# Altium PCB AudioMoth 1.1.0.PcbDoc
Units mm, origin at the board's own origin, x right, y up, seen from the top; angles counter-clockwise.
Board outline 58 x 48.36 mm, 2 copper layers (Top, Bottom); 86 components, 105 nets, 367 pads, 112 vias.
Unrouted connection lines stored in the file: 87.
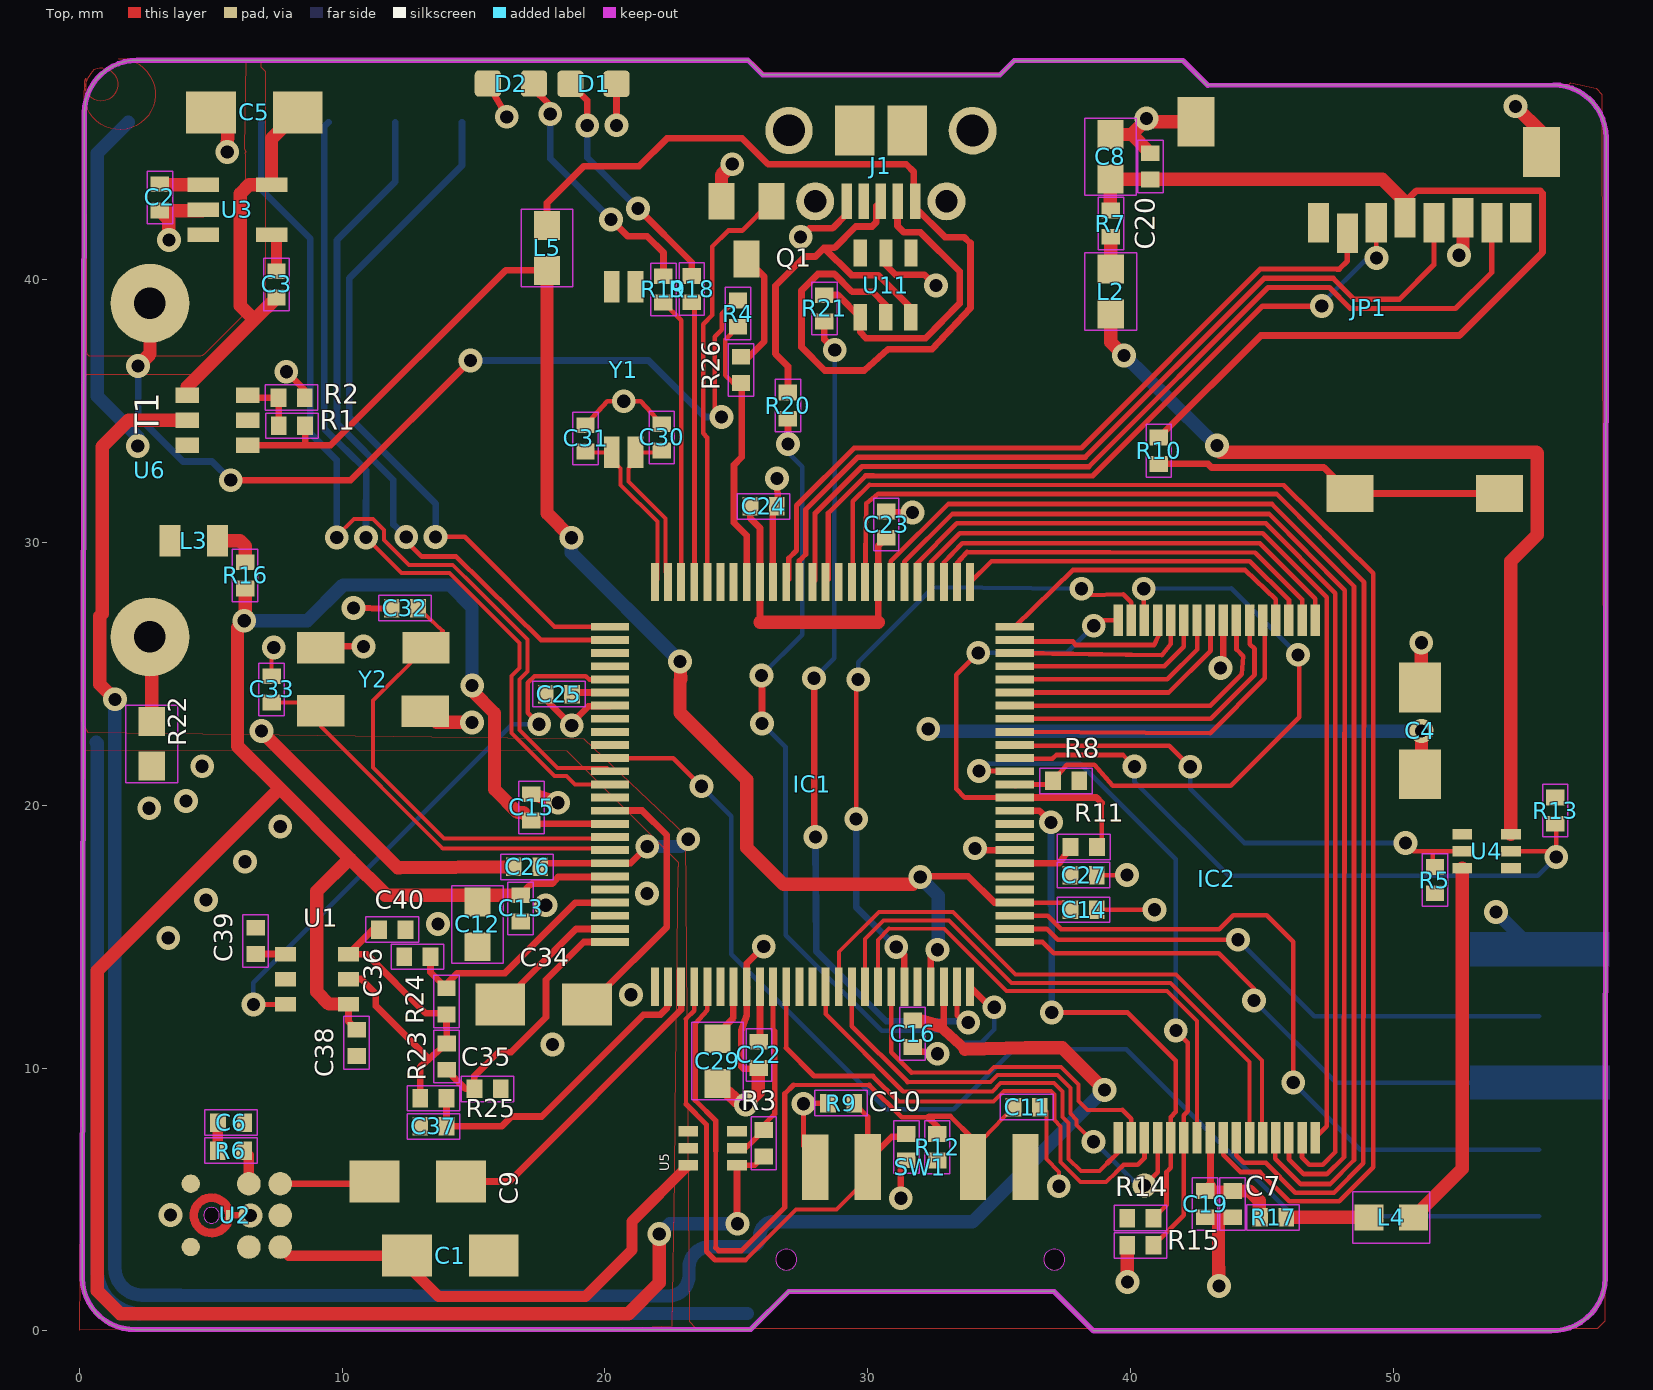
[diagram p0: Top view]
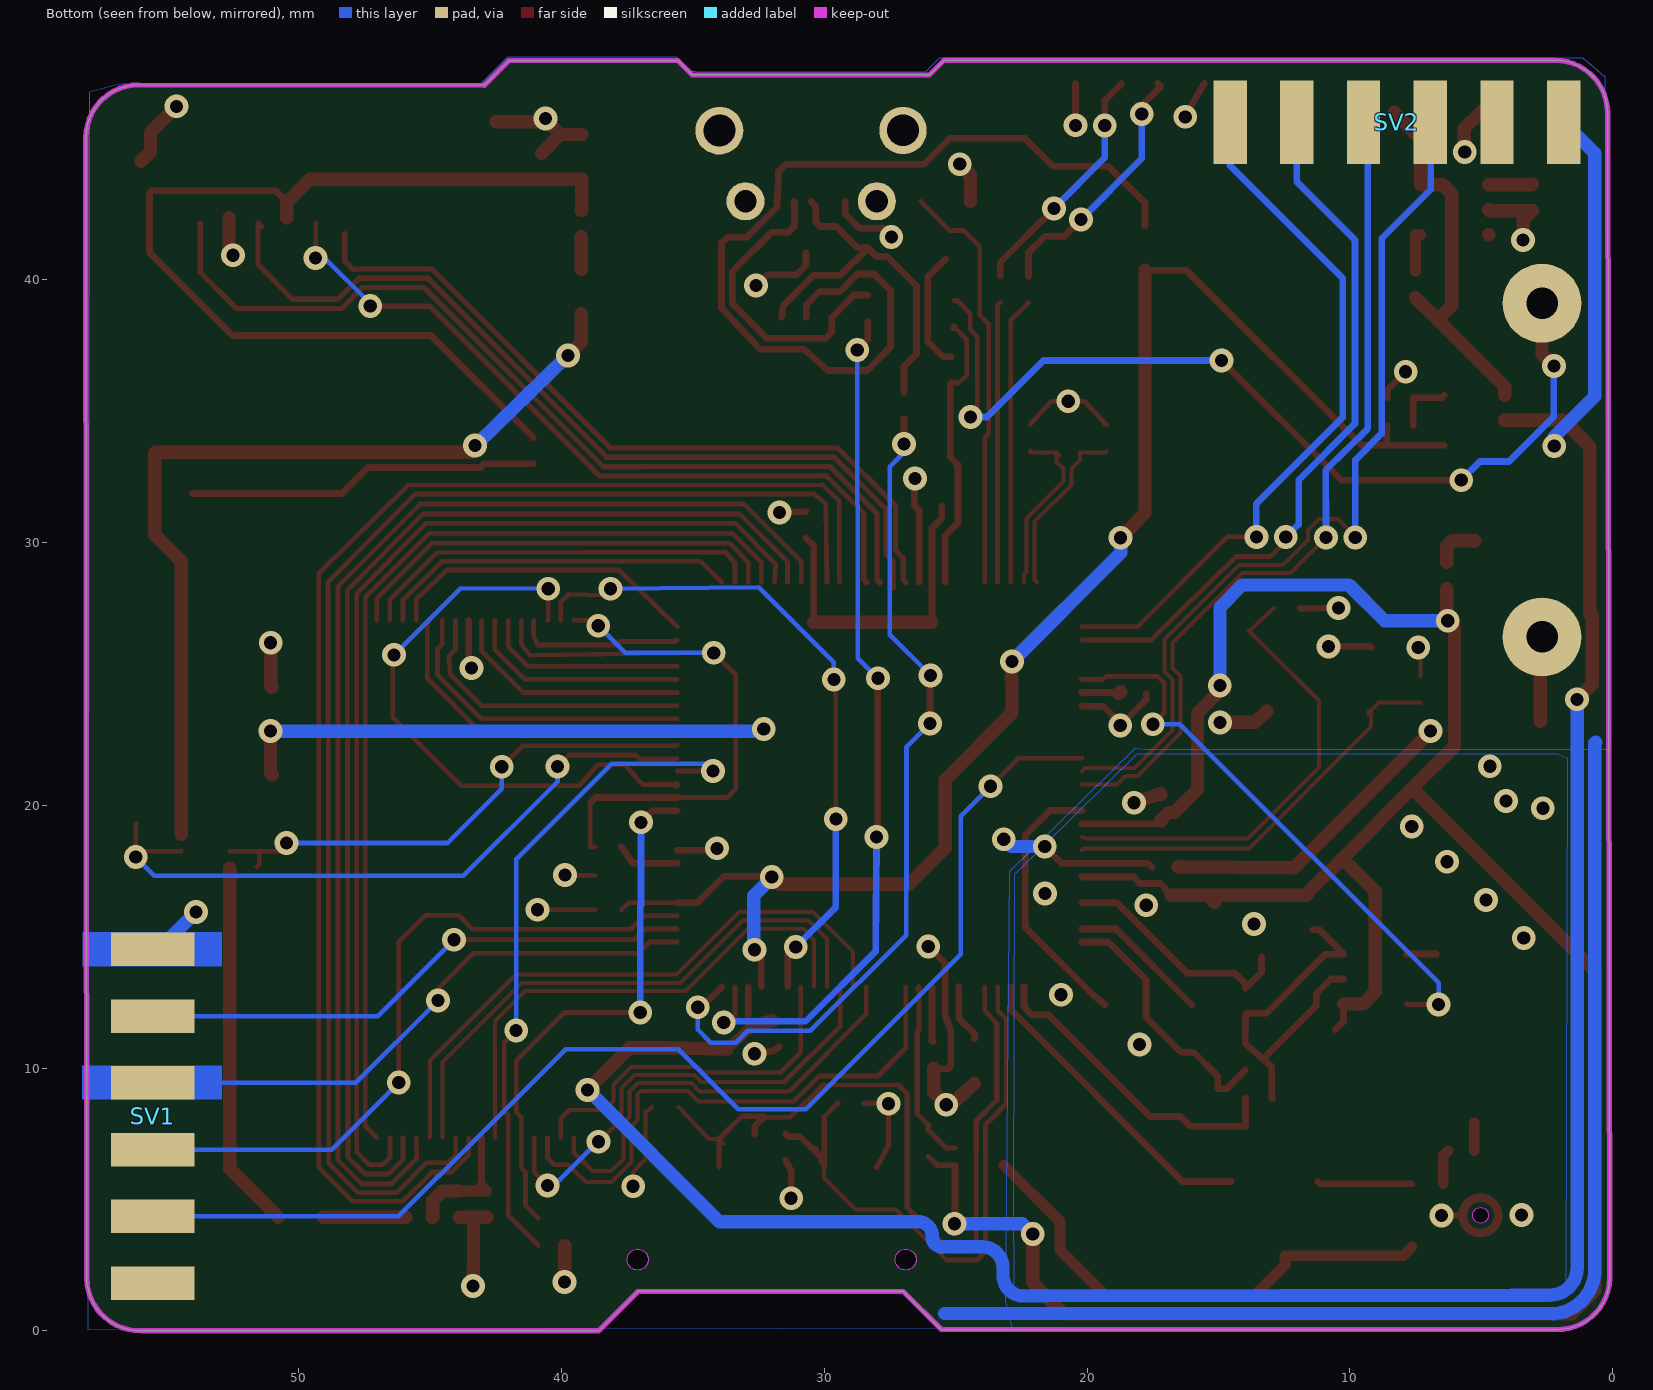
[diagram p1: Bottom view, seen from below]

## Layer stack, top to bottom
Top Solder: solder mask 0.0102, Solder Resist, Dk 3.5
Top: signal copper 0.035
Dielectric 1: dielectric 0.32, FR-4, Dk 4.8
Bottom: signal copper 0.035
Bottom Solder: solder mask 0.0102, Solder Resist, Dk 3.5

## Board outline
2.13,0.05 25.55,0.05 27,1.501 37.1,1.501 38.6,0 56,0 ccw(c56.04,2.04) 58.08,2 58.11,45.42 ccw(c56.11,45.42) 56.11,47.42 42.95,47.4 42,48.35 35.58,48.35 35.03,47.8 26.01,47.8 25.45,48.36 2.19,48.36 ccw(c2.19,46.36) 0.19,46.36 0.11,2 ccw(c2.095,2.035)
cut-out: 37.108,2.315 ccw(c37.108,2.715) 37.508,2.715 ccw(c37.108,2.715) 37.108,3.115 ccw(c37.108,2.715) 36.708,2.715 ccw(c37.108,2.715)
cut-out: 26.908,2.315 ccw(c26.908,2.715) 27.308,2.715 ccw(c26.908,2.715) 26.908,3.115 ccw(c26.908,2.715) 26.508,2.715 ccw(c26.908,2.715)
cut-out: 5.029,4.096 ccw(c5.029,4.396) 5.329,4.396 ccw(c5.029,4.396) 5.029,4.696 ccw(c5.029,4.396) 4.729,4.396 ccw(c5.029,4.396)

## Design rules (kind name [scope] priority, off if disabled: settings)
BoardOutlineClearance mdCopperDimension [All] p1: gap=0.254 ignorepadtopadclearanceinfootprint=FALSE except(0: Arc-SplitContinuation Track-SplitContinuation SMDPad-SplitContinuation THPad-SplitContinuation Via-SplitContinuation Fill-SplitContinuation Poly-SplitContinuation Region-SplitContinuation Text-SplitContinuation; 0.127: Poly-OutlineEdge Poly-CavityEdge Poly-CutoutEdge Poly-SplitBarrior)
Clearance "Clearance (Same Net)" [All] p1: gap=0.152 ignorepadtopadclearanceinfootprint=FALSE except(0.127: SMDPad-SMDPad SMDPad-THPad SMDPad-Via)
Clearance [All] p2: gap=0.152 ignorepadtopadclearanceinfootprint=FALSE except(0.127: Track-THPad Track-Via THPad-THPad THPad-Via Via-Via)
HoleSize [All] p1: absolutevalues=TRUE maxlimit=2540 minlimit=0.019 maxpercent=80.000 minpercent=20.000
HoleToHoleClearance mdDrill [All] p1: gap=0.076 allowstackedmicrovias=TRUE
MinimumSolderMaskSliver [All] p1 off: minsoldermaskwidth=0.254
PasteMaskExpansion Expansion_SMDPaste_OFF [InPadClass('SMDPaste_OFF')] p1: expansion=0
PasteMaskExpansion mlMinCreamFrame [All] p2: expansion=0
PolygonConnect PolygonConnect_For_PolygonThermal_ON_Width100000_Gap100000 [InPolygonClass('PolygonThermal_ON_Width100000_Gap100000') vs Not IsVia] p1: connectstyle=Relief reliefconductorwidth=0.254 reliefentries=4 polygonreliefangle="90 Angle" airgapwidth=0.254
PolygonConnect PolygonConnect_For_PolygonThermal_ON_Width70000_Gap100000 [InPolygonClass('PolygonThermal_ON_Width70000_Gap100000') vs Not IsVia] p2: connectstyle=Relief reliefconductorwidth=0.178 reliefentries=4 polygonreliefangle="90 Angle" airgapwidth=0.254
PolygonConnect ThermalVias [IsVia] p3: connectstyle=Direct reliefconductorwidth=0.254 reliefentries=4 polygonreliefangle="90 Angle" airgapwidth=0.254
PolygonConnect [All] p4: connectstyle=Relief reliefconductorwidth=0.254 reliefentries=4 polygonreliefangle="90 Angle" airgapwidth=0.254
RoutingVias [All] p1: holewidth=0.019 width=0.425 viastyle="Through Hole" minholewidth=0.019 minwidth=0.425 maxholewidth=2.54 maxwidth=2.54
SolderMaskExpansion Expansion_SMDSolder_OFF [InPadClass('SMDSolder_OFF')] p1: expansion=0 istentingtop=FALSE
SolderMaskExpansion mlMinStopFrame [All] p2: expansion=0 istentingtop=FALSE
Width [All] p1: maxlimit=0.254 minlimit=0.127 preferedwidth=0.127
26 further rules are at their usual default settings.

## Classes and differential pairs
polygon class PolygonThermal_ON_Width100000_Gap100000: Polygon_1_Net_AGND Polygon_1_Net_GND Polygon_2_Net_AGND
polygon class PolygonThermal_ON_Width70000_Gap100000: Polygon_1_Net_+3V3 Polygon_1_Net_VBAT
pad class SMDSolder_OFF: IC1-1 IC1-2 IC1-3 IC1-4 IC1-5 IC1-6 IC1-7 IC1-8 IC1-9 IC1-10 IC1-11 IC1-12 IC1-13 IC1-14 IC1-15 IC1-16 IC1-17 IC1-18 IC1-19 IC1-20 IC1-21 IC1-22 IC1-23 IC1-24 IC1-25 IC1-26 IC1-27 IC1-28 IC1-29 IC1-30 IC1-31 IC1-32 IC1-33 IC1-34 IC1-35 IC1-36 IC1-37 IC1-38 IC1-39 IC1-40 IC1-41 IC1-42 IC1-43 IC1-44 IC1-45 IC1-46 IC1-47 IC1-48 IC1-49 IC1-50 IC1-51 IC1-52 IC1-53 IC1-54 IC1-55 IC1-56 IC1-57 IC1-58 IC1-59 IC1-60 IC1-61 IC1-62 IC1-63 IC1-64 IC1-65 IC1-66 IC1-67 IC1-68 IC1-69 IC1-70 IC1-71 IC1-72 IC1-73 IC1-74 IC1-75 IC1-76 IC1-77 IC1-78 IC1-79 IC1-80 IC1-81 IC1-82 IC1-83 IC1-84 IC1-85 IC1-86 IC1-87 IC1-88 IC1-89 IC1-90 IC1-91 IC1-92 IC1-93 IC1-94 IC1-95 IC1-96 IC1-97 IC1-98 IC1-99 IC1-100
pad class SMDPaste_OFF: IC1-1 IC1-2 IC1-3 IC1-4 IC1-5 IC1-6 IC1-7 IC1-8 IC1-9 IC1-10 IC1-11 IC1-12 IC1-13 IC1-14 IC1-15 IC1-16 IC1-17 IC1-18 IC1-19 IC1-20 IC1-21 IC1-22 IC1-23 IC1-24 IC1-25 IC1-26 IC1-27 IC1-28 IC1-29 IC1-30 IC1-31 IC1-32 IC1-33 IC1-34 IC1-35 IC1-36 IC1-37 IC1-38 IC1-39 IC1-40 IC1-41 IC1-42 IC1-43 IC1-44 IC1-45 IC1-46 IC1-47 IC1-48 IC1-49 IC1-50 IC1-51 IC1-52 IC1-53 IC1-54 IC1-55 IC1-56 IC1-57 IC1-58 IC1-59 IC1-60 IC1-61 IC1-62 IC1-63 IC1-64 IC1-65 IC1-66 IC1-67 IC1-68 IC1-69 IC1-70 IC1-71 IC1-72 IC1-73 IC1-74 IC1-75 IC1-76 IC1-77 IC1-78 IC1-79 IC1-80 IC1-81 IC1-82 IC1-83 IC1-84 IC1-85 IC1-86 IC1-87 IC1-88 IC1-89 IC1-90 IC1-91 IC1-92 IC1-93 IC1-94 IC1-95 IC1-96 IC1-97 IC1-98 IC1-99 IC1-100 U4-1 U4-2 U4-3 U4-4 U4-5 U4-6 U5-1 U5-2 U5-3 U5-4 U5-5 U5-6

## Components (designator, comment, footprint, x,y, rotation, side; value= is the part's Value field where it differs from the comment)
C1 "" EIA3216-KIT 14.121,2.864 r180 top
C2 "" 0402 3.062,43.139 r270 top
C3 "" 0402 7.503,39.828 r90 top
C4 "" EIA3216-KIT 51.031,22.836 r270 top
C5 "" EIA3216-KIT 6.662,46.38 r0 top
C6 "" 0402 5.772,7.925 r0 top
C7 "" 0402 43.891,4.826 r270 top
C8 "" C0603 39.242,44.686 r90 top
C9 "" EIA3216-KIT 12.875,5.682 r180 top
C10 "" 0402 31.474,6.994 r90 top
C11 "" 0402 36.057,8.514 r180 top
C12 "" 0603-CAP 15.151,15.469 r270 top
C13 "" 0402 16.794,16.083 r270 top
C14 "" 0402 38.226,16.027 r0 top
C15 "" 0402 17.205,19.928 r90 top
C16 "" 0402 31.715,11.309 r270 top
C19 "" 0402 42.849,4.82 r270 top
C20 "" 0402 40.762,44.321 r90 top
C22 "" 0402 25.863,10.507 r270 top
C23 "" 0402 30.711,30.687 r90 top
C24 "" 0402 26.04,31.378 r0 top
C25 "" 0402 18.251,24.238 r180 top
C26 "" 0402 17.037,17.658 r180 top
C27 "" 0402 38.225,17.344 r0 top
C29 "" C0603 24.286,10.268 r270 top
C30 "" 0402 22.166,34.004 r270 top
C31 "" 0402 19.264,33.972 r270 top
C32 "" 0402 12.392,27.509 r0 top
C33 "" 0402 7.318,24.417 r270 top
C34 "" EIA3216-KIT 17.67,12.415 r0 top
C35 "" 0402 15.536,9.212 r0 top
C36 "" 0402 12.864,14.24 r180 top
C37 "" 0402 13.47,7.785 r180 top
C38 "" 0402 10.553,10.965 r270 top
C39 "" 0402 6.71,14.845 r90 top
C40 "" 0402 11.909,15.27 r0 top
D1 "" LED-0603 19.569,47.466 r270 top
D2 "" LED-0603 16.425,47.473 r90 top
IC1 "" QFP100 27.903,20.798 r270 top
IC2 "" IS62WV256 43.288,17.202 r0 top
J1 "" USB-MICRO-MOLEX-105017-0001 33.006,42.99 r180 top
JP1 "" 693071010811 47.16,42.171 r0 top
L2 "" 0603-RES 39.257,39.559 r90 top
L3 "" 0805 4.353,30.067 r0 top
L4 "" 0603-RES 49.932,4.319 r180 top
L5 "" 0603-RES 17.801,41.215 r270 top
Q1 "" SOT23 25.39,41.893 r180 top
R1 "" 0402 8.09,34.45 r0 top
R2 "" 0402 8.08,35.521 r180 top
R3 "" 0402 26.049,7.141 r90 top
R4 "" 0402 25.069,38.719 r90 top
R5 "" 0402 51.596,17.16 r90 top
R6 "" 0402 5.769,6.861 r0 top
R7 "" 0402 39.261,42.143 r90 top
R8 "" 0402 37.559,20.935 r0 top
R9 "" 0402 28.993,8.667 r180 top
R10 "" 0402 41.081,33.498 r90 top
R11 "" 0402 38.227,18.415 r180 top
R12 "" 0402 32.651,6.988 r90 top
R13 "" 0402 56.173,19.799 r270 top
R14 "" 0402 40.386,4.293 r180 top
R15 "" 0402 40.386,3.252 r0 top
R16 "" 0402 6.308,28.755 r90 top
R17 "" 0402 45.438,4.319 r180 top
R18 "" 0402 23.309,39.653 r270 top
R19 "" 0402 22.229,39.64 r270 top
R20 "" 0402 26.968,35.218 r90 top
R21 "" 0402 28.356,38.92 r90 top
R22 "" 0603-RES 2.756,22.342 r270 top
R23 "" 0402 13.98,10.435 r90 top
R24 "" 0402 13.973,12.54 r270 top
R25 "" 0402 13.47,8.855 r180 top
R26 "" 0402 25.182,36.576 r270 top
SV1 "" TSM-106-X-SH-BOARDEDGE 54.083,8.169 r270 bottom
SV2 "" TSM-106-X-SH-BOARDEDGE 8.21,44.53 r0 bottom
SW1 "" CT10-XXXX-G4 28.008,5.215 r0 top
T1 "" SOT23-6 5.26,34.66 r90 top
U1 "" SOT26@1 9.042,13.389 r270 top
U2 "" SPM0408LE5H-TB 5.945,4.4 r270 top
U3 "" SOT23-5 6.014,42.676 r270 top
U4 "" SC-70 53.56,18.258 r270 top
U5 "" SC-70 24.105,6.957 r90 top
U6 "" BATTERY-AAX3 29.107,24.191 r0 top
U11 "" SC-74 30.924,39.775 r180 top
Y1 "" CRYSTAL-32KHZ-SMD_EPSON_MC146 21.465,32.839 r90 top
Y2 "" XRCGB48M000F4M00R0 11.227,24.694 r180 top

## Footprints (in the part's own frame and the unit in brackets; to place one, negate y for a bottom-side part, rotate by r counter-clockwise, add the part's x,y. Pads: shape width x height; smd on the part's side, far side on the other; paste and mask are expansions set on the pad)
0402 [mm] "0402"
  rect 0.6x0.7 smd: 1(-0.5,0) 2(0.5,0)
  Top keep-out lines w0.051: 1,-0.483 -1,-0.483 -1,0.483 1,0.483 1,-0.483
  body extent -1.03,-0.51 1.03,0.51, height 3.81
0603-CAP [mm] "0603-CAP"
  rect 1.1x1 smd: 1(-0.85,0) 2(0.85,0)
  Top keep-out lines w0.051: 1.473,-0.983 -1.473,-0.983 -1.473,0.983 1.473,0.983 1.473,-0.983
  body extent -1.5,-1.01 1.5,1.01, height 3.81
0603-RES [mm] "0603-RES"
  rect 1.1x1 smd: 1(-0.85,0) 2(0.85,0)
  Top keep-out lines w0.051: -1.473,0.983 -1.473,-0.983 1.473,-0.983 1.473,0.983 -1.473,0.983
  body extent -1.5,-1.01 1.5,1.01, height 3.81
0805 [mil] "0805"
  rect 31.5x47.24 smd: 1(-35.43,0) 2(35.43,0)
  body extent -51,-24 51,24, height 50
693071010811 [mil] "693071010811"
  rect 31.5x59.06 smd: 1(0,0) 2(43.31,-15.75) 3(86.61,0) 4(129.92,7.87) 5(173.23,0) 6(216.54,7.87) 7(259.84,0) 8(303.15,0)
  rect 55.12x74.8 smd: Z1(-183.46,151.57) Z2(334.25,106.3)
  rect 70.87x55.12 smd: Z3(47.24,-405.51) Z4(271.26,-405.51)
  body extent -211,-433 362,359, height 150
BATTERY-AAX3 [mm] "BATTERY-AAX3"
  round 3 hole 1.2: GND@2(-26.42,2.22) PWR@1(-26.42,14.92)
  body extent -27.93,0.71 -24.91,16.43, height 1.27
C0603 [mm] "C0603"
  rect 1.1x1 smd: 1(-0.85,0) 2(0.85,0)
  Top keep-out lines w0.051: -1.473,0.983 -1.473,-0.983 1.473,-0.983 1.473,0.983 -1.473,0.983
  body extent -1.5,-1.01 1.5,1.01, height 3.81
CRYSTAL-32KHZ-SMD_EPSON_MC146 [mm] "CRYSTAL-32KHZ-SMD_EPSON_MC146"
  rect 1.2x0.6 smd: NC1(6.9,1.2) NC2(6.9,0.3) P$1(0.6,0.3) P$2(0.6,1.2)
  body extent 0,-0.07 7.5,1.57, height 3.81
CT10-XXXX-G4 [mm] "CT10-XXXX-G4"
  rect 1x2.5 smd: 1(0,1.01) 2(2,1.025) 3(6,1.025) 4(8,1.025)
  body extent -0.5,-0.24 8.5,2.27, height 1.27
EIA3216-KIT [mm] "EIA3216-KIT"
  rect 1.9x1.6 smd: A(1.65,0) C(-1.65,0)
  body extent -2.6,-0.8 2.6,0.8, height 1.27
IS62WV256 [mm] "IS62WV256"
  rect 0.36x1.2 smd: 1(-3.75,-9.85) 2(-3.25,-9.85) 3(-2.75,-9.85) 4(-2.25,-9.85) 5(-1.75,-9.85) 6(-1.25,-9.85) 7(-0.75,-9.85) 8(-0.25,-9.85) 9(0.25,-9.85) 10(0.75,-9.85) 11(1.25,-9.85) 12(1.75,-9.85) 13(2.25,-9.85) 14(2.75,-9.85) 15(3.25,-9.85) 16(3.75,-9.85) 17(3.75,9.85) 18(3.25,9.85) 19(2.75,9.85) 20(2.25,9.85) 21(1.75,9.85) 22(1.25,9.85) 23(0.75,9.85) 24(0.25,9.85) 25(-0.25,9.85) 26(-0.75,9.85) 27(-1.25,9.85) 28(-1.75,9.85) 29(-2.25,9.85) 30(-2.75,9.85) 31(-3.25,9.85) 32(-3.75,9.85)
  body extent -3.93,-10.45 3.93,10.45, height 3.81
LED-0603 [mm] "LED-0603"
  rrect30% 1x1 smd: A(0,-0.877) C(0,0.877)
  body extent -0.51,-1.39 0.51,1.39, height 1.27
QFP100 [mm] "QFP100"
  rect 1.45x0.3 smd paste+0 mask+0: 1(-7.7,6) 2(-7.7,5.5) 3(-7.7,5) 4(-7.7,4.5) 5(-7.7,4) 6(-7.7,3.5) 7(-7.7,3) 8(-7.7,2.5) 9(-7.7,2) 10(-7.7,1.5) 11(-7.7,1) 12(-7.7,0.5) 13(-7.7,0) 14(-7.7,-0.5) 15(-7.7,-1) 16(-7.7,-1.5) 17(-7.7,-2) 18(-7.7,-2.5) 19(-7.7,-3) 20(-7.7,-3.5) 21(-7.7,-4) 22(-7.7,-4.5) 23(-7.7,-5) 24(-7.7,-5.5) 25(-7.7,-6) 51(7.7,-6) 52(7.7,-5.5) 53(7.7,-5) 54(7.7,-4.5) 55(7.7,-4) 56(7.7,-3.5) 57(7.7,-3) 58(7.7,-2.5) 59(7.7,-2) 60(7.7,-1.5) 61(7.7,-1) 62(7.7,-0.5) 63(7.7,0) 64(7.7,0.5) 65(7.7,1) 66(7.7,1.5) 67(7.7,2) 68(7.7,2.5) 69(7.7,3) 70(7.7,3.5) 71(7.7,4) 72(7.7,4.5) 73(7.7,5) 74(7.7,5.5) 75(7.7,6)
  rect 0.3x1.45 smd paste+0 mask+0: 26(-6,-7.7) 27(-5.5,-7.7) 28(-5,-7.7) 29(-4.5,-7.7) 30(-4,-7.7) 31(-3.5,-7.7) 32(-3,-7.7) 33(-2.5,-7.7) 34(-2,-7.7) 35(-1.5,-7.7) 36(-1,-7.7) 37(-0.5,-7.7) 38(0,-7.7) 39(0.5,-7.7) 40(1,-7.7) 41(1.5,-7.7) 42(2,-7.7) 43(2.5,-7.7) 44(3,-7.7) 45(3.5,-7.7) 46(4,-7.7) 47(4.5,-7.7) 48(5,-7.7) 49(5.5,-7.7) 50(6,-7.7) 76(6,7.7) 77(5.5,7.7) 78(5,7.7) 79(4.5,7.7) 80(4,7.7) 81(3.5,7.7) 82(3,7.7) 83(2.5,7.7) 84(2,7.7) 85(1.5,7.7) 86(1,7.7) 87(0.5,7.7) 88(0,7.7) 89(-0.5,7.7) 90(-1,7.7) 91(-1.5,7.7) 92(-2,7.7) 93(-2.5,7.7) 94(-3,7.7) 95(-3.5,7.7) 96(-4,7.7) 97(-4.5,7.7) 98(-5,7.7) 99(-5.5,7.7) 100(-6,7.7)
  body extent -8.49,-8.49 8.49,8.49, height 3.81
SC-70 [mm] "SC-70"
  rect 0.4x0.75 smd paste+0: 1(-0.65,-0.925) 2(0,-0.925) 3(0.65,-0.925) 4(0.65,0.925) 5(0,0.925) 6(-0.65,0.925)
  body extent -1.07,-1.3 1.07,1.3, height 3.81
SC-74 [mil] "SC-74"
  rect 20x40 smd: 1(-28.62,-49.13) 2(8.86,-49.21) 3(47.24,-49.21) 4(47.44,47.24) 5(9.25,47.05) 6(-28.54,47.24)
  body extent -39,-69 57,67, height 50
SOT23 [mm] "SOT23"
  rect 1x1.4 smd: 1(-0.95,-1.1) 2(0.95,-1.1) 3(0,1.1)
  body extent -1.5,-1.8 1.5,1.8, height 3.81
SOT23-5 [mm] "SOT23-5"
  rect 0.55x1.2 smd: 1(-0.95,-1.3) 2(0,-1.3) 3(0.95,-1.3) 4(0.95,1.3) 5(-0.95,1.3)
  body extent -1.48,-1.9 1.48,1.9, height 3.81
SOT23-6 [mm] "SOT23-6"
  rect 0.6x0.9 smd: 1(-0.95,-1.15) 2(0,-1.15) 3(0.95,-1.15) 4(0.95,1.15) 5(0,1.15) 6(-0.95,1.15)
  body extent -1.51,-1.6 1.5,1.6, height 3.81
SOT26@1 [mil] "SOT26@1"
  rect 21.65x31.5 smd: 1(-37.4,-47.24) 2(0,-47.24) 3(37.4,-47.24) 4(37.4,47.24) 5(0,47.24) 6(-37.4,47.24)
  body extent -62,-63 62,63, height 150
SPM0408LE5H-TB [mil] "SPM0408LE5H-TB"
  rrect100% 35.43x35.43 smd: P$1(-47.24,66.93) P$2(-47.24,19.92) P$5(47.56,19.92) P$6(47.56,66.93) P$7(0.16,66.93)
  rrect100% 27.56x27.56 smd: P$3(-47.24,-67.17) P$4(47.56,-67.17)
  rrect3% 16x8 smd: P$8(0,-10.24)
  Top circle w12.99: c0.16,-36.06 r26.5
  body extent -65,-81 66,85, height 150
TSM-106-X-SH-BOARDEDGE [mil] "TSM-106-X-SH-BOARDEDGE"
  rect 50x125 smd: 1(-250,-58) 2(-150,-58) 3(-50,-58) 4(50,-58) 5(150,-58) 6(250,-58)
  body extent -275,-121 275,5, height 50
USB-MICRO-MOLEX-105017-0001 [mm] "USB-MICRO-MOLEX-105017-0001"
  rect 0.4x1.35 smd: 1(1.2,0) 2(1.85,0) 3(2.5,0) 4(3.15,0) 5(3.8,0)
  round 1.45 hole 0.85: P$1(0,0) P$2(5,0)
  rect 1.5x1.9 smd: P$3(3.5,-2.7) P$4(1.5,-2.7)
  round 1.8 hole 1.2: P$5(-1.006,-2.685) P$6(5.997,-2.697) P$7(-0.983,-2.697)
  body extent -1.91,-3.65 6.9,0.73, height 1.27
XRCGB48M000F4M00R0 [mil] "XRCGB48M000F4M00R0"
  rect 70.87x47.24 smd: P$1(-77.28,-51.42) P$2(80.12,-51.5) P$3(80.24,43.03) P$4(-76.48,43.58)
  body extent -113,-75 116,67, height 50

## Part data
C1 C4 C5 C9 C34: library part EIA3216-KIT, PackageName=EIA3216-KIT
C2 C3 C6 C7 C10 C11 C13 C14 C15 C16 C19 C20 C22 C23 C24 C25 C26 C27 C30 C31 C32 C33 C35 C36 C37 C38 C39 C40 R1 R2 R3 R4 R5 R6 R7 R8 R9 R10 R11 R12 R13 R14 R15 R16 R17 R18 R19 R20 R21 R23 R24 R25 R26: library part 0402, PackageName=0402
C8 C29: library part C0603, PackageName=C0603
C12: library part 0603-CAP, PackageName=0603-CAP
D1 D2: library part LED-0603, PackageName=LED-0603
IC1: library part QFP100, PackageName=QFP100
IC2: library part IS62WV256, PackageName=IS62WV256
J1: library part USB-MICRO-MOLEX-105017-0001, PackageName=USB-MICRO-MOLEX-105017-0001
JP1: library part 693071010811, PackageName=693071010811
L2 L4 L5 R22: library part 0603-RES, PackageName=0603-RES
L3: library part 0805, PackageName=0805
Q1: library part SOT23, PackageName=SOT23
SV1 SV2: library part TSM-106-X-SH-BOARDEDGE, PackageName=TSM-106-X-SH-BOARDEDGE
SW1: library part CT10-XXXX-G4, PackageName=CT10-XXXX-G4
T1: library part SOT23-6, PackageName=SOT23-6
U1: library part SOT26@1, PackageName=SOT26@1
U2: library part SPM0408LE5H-TB, PackageName=SPM0408LE5H-TB
U3: library part SOT23-5, PackageName=SOT23-5
U4 U5: library part SC-70, PackageName=SC-70
U6: library part BATTERY-AAX3, PackageName=BATTERY-AAX3
U11: library part SC-74, PackageName=SC-74
Y1: library part CRYSTAL-32KHZ-SMD_EPSON_MC146, PackageName=CRYSTAL-32KHZ-SMD_EPSON_MC146
Y2: library part XRCGB48M000F4M00R0, PackageName=XRCGB48M000F4M00R0

## Free pads (board coordinates)
  round 0.6 hole 0.6 unplated: MH1(5.029,4.396)
  round 0.8 hole 0.8 unplated: MH1(26.908,2.715) MH2(37.108,2.715)

## Via types
v1: diameter 0.907/0.907 (per signal layer), hole 0.5, Top to Bottom, 112 vias

## Nets (pads, with @x,y where several pads share a name; then routed paths per layer and width w, separated by ;. In a path a pad name is that pad's centre, name@x,y a point inside that pad or via, vN(x,y) a via of type N, cw(c..) or ccw(c..) an arc to the next point about the centre after c; other vN are vias at no path point)
+3V3: C4.A C23.1 C24.1 C25.1 C26.1 C27.1 C29.1 IC1.8 IC1.17 IC1.31 IC1.44 IC1.57 IC1.82 L3.1 R5.1 R8.2 R11.2 R12.1 R13.1 R14.2 SV1.1 SV2.1 T1.2 T1.6 U4.1 U4.4 | length 62.3
  Top w0.254: C26.1 17.676,17.798 IC1.44 20.98,17.798 v1(21.616,18.434) ; C25.1 18.811,24.298 IC1.31 18.836,24.298 C25.1@18.796,24.257 ; C29.1 24.279,11.3 24.892,11.913 24.892,13.087 IC1.57 ; C24.1 25.54,30.924 25.908,30.557 25.908,28.503 IC1.17 25.903,26.981 25.908,26.975 ; 30.404,26.975 30.404,28.496 IC1.8 30.403,29.879 C23.1 ; IC1.82 37.287,17.798 R11.2
  Top w0.508: C25.1@18.72,24.334 C25.1@18.796,24.257 ; 25.908,26.975 30.404,26.975 ; C4.A@51.01,21.165 C4.A 51.08,21.235 v1(51.08,22.828)
  Bottom w0.5: 0.678,40.3 0.678,44.822 SV2.1
  Bottom w0.508: 0.678,40.3 0.678,35.571 2.22,34.029 v1(2.22,33.677) ; v1(21.616,18.434) 22.897,18.434 v1(23.175,18.712) ; v1(32.309,22.911) 32.392,22.828 v1(51.08,22.828) ; v1(53.923,15.938) 55.343,14.519 SV1.1
AGND: C1.C C6.2 C12.2 C13.2 C15.2 C35.2 C36.2 C37.2 C38.2 C39.2 C40.2 IC1.48 IC1.51 R22.2 U1.2 U2.P$3 U2.P$4 U2.P$5 U2.P$7 U2.P$8 | length 2
  Top w0.254: U2.P$8 5.689,4.397 v1(6.509,4.397)
  Top w0.508: v1@4.631,21.446 v1(4.674,21.489) ; C15.2 17.221,20.444 v1(18.211,20.099)
  other v1: 3.474,4.404 18.008,10.897 21,12.794 3.384,14.957 13.65,15.489 17.749,16.202 4.824,16.395 21.599,16.652 6.3,17.853 7.644,19.196 2.657,19.889 4.057,20.169
BAT_ACMP_V: IC1.18 R4.1 R26.2 | length 10.7
  Top w0.178: R4.1 24.58,37.73 24.58,36.376 24.879,36.077 R26.2
  Top w0.254: R4.1@25.069,38.183 R4.1 ; R26.2 25.207,36.051 25.207,33.249 24.917,32.96 24.917,30.76 25.403,30.275 IC1.18
BAT_MON_EN: IC1.21 Q1.1 | length 15.9
  Top w0.178: IC1.21 23.903,34 23.741,34.161 23.741,38.316 24.089,38.664 24.089,41.273 24.696,41.88 25.227,41.88 Q1.1
CPU_FET_SD_EN_N: IC1.91 R5.2 U4.2 | length 19.8
  Top w0.178: IC1.91 35.624,22.276 41.478,22.276 v1(42.283,21.468) ; v1(50.47,18.568) 50.78,18.258 51.511,18.258 ; R5.2 51.511,17.744 51.511,18.258 ; U4.2 51.511,18.258
  Bottom w0.178: v1(42.283,21.468) 42.283,20.633 44.348,18.568 v1(50.47,18.568)
CPU_FET_SRAM_EN_N: IC1.90 R13.2 U4.5 | length 26.3
  Top w0.178: IC1.90 35.625,21.776 37.036,21.776 37.178,21.918 39.721,21.918 v1(40.16,21.479) ; U4.5 55.987,18.258 v1(56.21,18.034) 56.21,19.262 R13.2
  Bottom w0.178: v1(40.16,21.479) 40.16,20.902 43.739,17.323 55.499,17.323 v1(56.21,18.034)
CPU_SD_CLK: IC1.14 JP1.5 | length 33.3
  Top w0.2: IC1.14 27.403,29.313 27.648,29.558 27.648,31.262 29.64,33.254 38.285,33.254 45.091,40.06 47.722,40.06 48.519,39.263 50.242,39.263 51.56,40.58 JP1.5 JP1.5@51.42,42.031
  Top w0.254: IC1.14@27.403,28.278 IC1.14
CPU_SD_CS: IC1.15 JP1.2 | length 28.9
  Top w0.2: IC1.15 27,28.595 27,29.409 27.295,29.704 27.295,31.407 29.494,33.606 38.139,33.606 44.946,40.413 47.868,40.413 47.87,40.41 47.95,40.41 48.26,40.721 JP1.2
CPU_SD_MOSI: IC1.12 JP1.3 | length 29
  Top w0.178: JP1.3 49.366,42.165 v1(49.366,40.831)
  Top w0.2: IC1.12 28.5,28.595 28.5,31.117 29.932,32.549 30.215,32.549 37.171,32.538 38.566,32.538 45.03,39.002 v1(47.283,39.002)
  Top w0.254: IC1.12 IC1.12@28.403,28.488
  Bottom w0.178: v1(47.283,39.002) 47.258,39.078 49.011,40.831 v1(49.366,40.831)
CPU_SRAM_CS0: IC1.88 IC2.30 R8.1 | length 23.3
  Top w0.178: IC1.88@35.623,20.778 IC1.88 36.919,20.798 R8.1 37.59,21.552 38.628,21.552 39.329,20.752 43.828,20.752 46.431,23.355 46.431,25.68 v1(46.38,25.731) ; IC1.88@35.648,20.803 IC1.88@35.699,20.752 ; v1(40.513,28.245) 40.513,27.076 IC2.30
  Top w0.254: IC1.88@35.623,20.778 IC1.88@35.648,20.803
  Bottom w0.178: v1(40.513,28.245) 43.84,28.271 v1(46.38,25.731)
CPU_SRAM_CS1: IC1.89 IC2.6 R15.2 | length 25.9
  Top w0.178: v1(34.239,21.311) 35.589,21.311 IC1.89 ; R15.2 42.037,4.403 IC2.6 ; v1(41.732,11.43) 42.189,10.973 42.189,8.357 42.038,8.205 IC2.6
  Bottom w0.178: v1(34.239,21.311) 34.519,21.59 38.1,21.59 41.732,17.958 v1(41.732,11.43)
CPU_SRAM_OE_N: IC1.87 IC2.32 R11.1 | length 19
  Top w0.178: v1(34.214,25.807) 33.376,24.969 33.376,20.625 33.703,20.298 IC1.87 ; v1(38.608,26.838) 38.824,27.052 IC2.32 ; R11.1 38.913,18.424 38.913,20.092
  Top w0.254: IC1.87 38.707,20.298 38.913,20.092
  Bottom w0.178: v1(34.214,25.807) 37.579,25.807 v1(38.608,26.838)
CPU_SRAM_WE_N: IC1.86 IC2.5 R14.1 | length 20.7
  Top w0.178: v1(37.008,12.116) 39.903,12.116 41.732,10.287 41.732,8.332 41.538,8.137 IC2.5 ; R14.1 41.377,4.784 41.377,6.046 41.538,6.207 IC2.5 ; IC2.5@41.529,7.343 IC2.5
  Top w0.254: IC1.86 36.54,19.798 v1(36.982,19.355)
  Bottom w0.254: v1(36.982,19.355) 36.982,16.206 37.008,16.18 v1(37.008,12.116)
CPU_USB_D+: IC1.75 R20.1 | length 33
  Top w0.254: v1(25.959,24.943) 25.984,24.918 v1(25.984,23.114) ; R20.1 26.968,33.763 v1(26.975,33.757) ; IC1.75 34.823,12.177 v1(34.823,12.319)
  Bottom w0.178: v1(25.959,24.943) 27.508,26.493 27.508,32.893 26.975,33.427 v1@26.975,33.579 ; v1(25.984,23.114) 26.873,22.225 26.873,16.815 26.886,16.802 26.886,15.065 30.533,11.418 32.918,11.418 33.371,10.966 34.318,10.966 34.823,11.471 v1(34.823,12.319)
  Bottom w0.254: v1@26.975,33.579 v1(26.975,33.757)
CPU_USB_D-: IC1.74 R21.1 | length 33
  Top w0.178: IC1.74 33.403,11.991 v1(33.833,11.735)
  Top w0.254: v1(27.965,24.842) 27.965,19.025 28.016,18.974 v1(28.016,18.796) ; R21.1 28.356,37.735 v1(28.753,37.338)
  Bottom w0.178: v1(27.965,24.842) 28.727,25.604 v1(28.753,37.338)
  Bottom w0.254: v1(28.016,18.796) 28.042,14.453 30.709,11.786 33.63,11.786 v1(33.833,11.735)
GND: C2.2 C4.C C5.C C7.2 C8.2 C10.1 C11.1 C14.2 C16.2 C19.2 C20.2 C22.2 C23.2 C24.2 C25.2 C26.2 C27.2 C29.2 C30.1 C31.1 C32.1 C33.1 D1.C D2.C IC1.16 IC1.32 IC1.58 IC1.83 IC2.24 J1.5 JP1.6 JP1.Z1 JP1.Z2 Q1.2 R2.1 R9.2 R15.1 R22.1 SV1.6 SV2.2 SW1.1 U3.2 U6.GND@2 U11.2 Y2.P$2 Y2.P$4 | length 137.1
  Top w0.152: C33.1 7.318,25.96 v1(7.396,26.011) ; C11.1 36.807,8.344 36.807,6.533 37.289,6.05 v1(37.279,5.503)
  Top w0.178: C31.1 20.094,35.382 v1(20.718,35.382) 21.368,35.382 C30.1 ; C27.2 39.868,17.344 v1(39.874,17.35) ; C14.2 40.003,16.027 v1(40.915,16.029)
  Top w0.2: SW1.1 27.565,7.038 v1(27.565,8.645) 27.587,8.667 R9.2
  Top w0.254: v1(7.877,36.507) 8.58,35.804 R2.1 ; Y2.P$2 9.241,26.052 v1(10.817,26.052) ; v1(10.437,27.518) 11.75,27.484 C32.1 ; D2.C 16.113,46.493 v1(16.267,46.207) ; C25.2 17.752,24.029 v1(18.741,23.04) 18.741,23.135 19.38,23.775 20.18,23.775 IC1.32 IC1.32@20.195,23.79 ; v1(20.444,45.884) 20.446,46.12 D1.C ; IC1.58 25.403,13.982 v1(26.048,14.627) ; IC1.58@25.425,13.081 25.4,13.056 25.4,12.015 25.197,11.43 25.197,10.059 25.273,9.983 25.839,9.983 C22.2 ; IC1.16 26.391,28.498 26.391,31.229 C24.2 26.583,31.421 v1(26.557,32.443) ; v1(27.453,41.635) 27.779,41.96 28.66,41.96 29.206,42.506 J1.5 ; U11.2 30.699,40.561 31.054,40.201 32.16,40.201 v1(32.604,39.793) ; C23.2 31.346,31.162 v1(31.713,31.148) ; v1(31.266,5.045) 31.266,6.105 C10.1 ; C16.2 31.949,10.651 v1(32.659,10.55) ; v1(34.082,18.366) 34.151,18.298 IC1.83 ; v1(40.617,46.146) 42.019,46.146 JP1.Z1 ; v1@43.538,25.477 IC2.24
  Top w0.406: v1(43.428,25.231) v1@43.538,25.477
  Top w0.508: 2.687,26.411 2.756,26.342 R22.1 ; v1(3.407,41.517) 3.407,42.294 C2.2 4.677,42.639 U3.2 ; C5.C@4.916,46.476 C5.C 5.642,45.77 v1(5.629,44.87) ; v1(6.929,22.829) 12.124,17.633 12.205,17.633 C26.2 ; Y2.P$4 13.599,23.158 v1(14.945,23.158) ; C29.2 25.19,8.608 v1(25.362,8.608) 25.839,9.085 C22.2@25.839,9.983 ; Q1.2 24.44,43.993 v1(24.852,44.405) ; C8.2 40.047,45.536 ; R15.1 39.889,3.248 v1(39.889,1.863) ; C20.2 40.047,45.536 ; JP1.Z1 40.531,46.021 40.047,45.536 ; C19.2 42.855,4.327 43.358,4.327 ; v1(43.369,1.711) 43.358,3.246 43.358,4.327 ; C7.2 43.358,4.327 ; C4.C 51.076,24.531 v1(51.076,26.19) ; v1(52.505,40.939) 52.66,41.095 JP1.6 ; v1(54.657,46.607) 55.65,45.614 JP1.Z2 JP1.Z2@56.01,44.511
  Bottom w0.508: 0.64,22.4 0.68,22.361 0.68,2.43 ccw(c2.359,2.33) 2.259,0.651 23.244,0.661 25.421,0.661
HFXTAL_CPU_CLK_N: C33.2 IC1.43 Y2.P$3 | length 15.8
  Top w0.152: C33.2 8.885,23.917 Y2.P$3 ; Y2.P$3@9.267,23.601 Y2.P$3 ; Y2.P$3@9.303,23.488 Y2.P$3 ; IC1.43 20.136,18.365 13.831,18.365 9.189,23.006 Y2.P$3
HFXTAL_CPU_CLK_P: C32.2 IC1.42 Y2.P$1 | length 17.7
  Top w0.152: C32.2@12.892,27.509 13.831,26.642 Y2.P$1 11.176,23.986 11.176,21.45 13.881,18.746 19.998,18.746 IC1.42
LFXTAL_CPU_CLK_N: C31.2 IC1.25 Y1.P$2 | length 6.7
  Top w0.152: C31.2 19.311,33.439 Y1.P$2 20.265,33.152 20.599,32.817 20.599,32.195 21.996,30.798 21.996,28.591 IC1.25
LFXTAL_CPU_CLK_P: C30.2 IC1.24 Y1.P$1 | length 6.9
  Top w0.152: Y1.P$1@21.063,33.337 Y1.P$1 ; C30.2 22.151,33.439 Y1.P$1 ; IC1.24 22.403,28.791 22.301,28.893 22.301,30.925 20.904,32.322 20.904,32.817 21.165,33.078 Y1.P$1
MIC_CPU_DATA: C9.C IC1.53 | length 12
  Top w0.254: C9.C 16.365,5.682 22.903,12.22 IC1.53
N$2: L3.2 R16.2 | length 1.8
  Top w0.508: L3.2 6.113,30.067 6.308,29.872 R16.2
N$3: C22.1 IC1.59 | length 2.1
  Top w0.254: C22.1 25.903,11.046 IC1.59
N$4: C8.1 C20.1 JP1.4 R7.2 R10.2 | length 38.6
  Top w0.254: R10.2 44.968,37.884 52.524,37.884 55.69,41.05 55.69,43.3 55.59,43.4 50.898,43.4 JP1.4@50.46,42.963
  Top w0.508: R7.2 39.242,42.661 C8.1 C20.1@40.747,43.836 ; C20.1@40.762,43.821 C20.1@40.747,43.836 ; JP1.4 50.46,42.963 49.587,43.836 C20.1@40.747,43.836
N$5: C34.C IC1.49 | length 5.4
  Top w0.254: C34.C 18.903,15.298 IC1.49
N$6: L2.2 R7.1 | length 1.2
  Top w0.508: L2.2 39.261,40.412 R7.1
N$7: L2.1 U4.6 | length 34
  Top w0.508: L2.1 39.257,37.63 v1(39.765,37.122) ; v1(43.296,33.693) 43.423,33.439 55.462,33.439 55.49,33.412 55.49,30.3 54.486,29.296 U4.6
  Bottom w0.508: v1(39.765,37.122) v1(43.296,33.693)
N$8: C9.A U2.P$1 | length 3.6
  Top w0.254: U2.P$1 11.143,5.6 C9.A
N$9: Q1.3 R26.1 | length 4.5
  Top w0.254: R26.1 25.486,37.077 26.073,37.664 26.073,40.109 Q1.3
N$10: 
N$11: C11.2 IC1.55 R12.2 SW1.3 | length 30.4
  Top w0.152: 27.178,9.353 30.064,9.353 30.069,9.353 ; SW1.3@33.838,7.139 34.008,7.308 34.392,7.308 C11.2
  Top w0.178: 23.442,11.692 23.903,12.199 IC1.55 ; 24.224,3.165 24.224,6.843 ; 30.069,9.353 31.298,8.136 32.274,8.136
  Top w0.2: 23.442,11.692 23.442,8.775 24.224,7.993 24.224,6.843 ; 24.224,3.165 24.339,3.05 25.2,3.05 26.848,4.698 26.848,9.022 27.178,9.353 ; 30.064,9.353 30.066,9.35 ; 32.274,8.136 32.305,8.136 32.338,8.169 33.148,8.169 34.008,7.308 SW1.3
  Top w0.254: 32.305,8.136 32.651,7.79 R12.2
N$12: 
N$13: C3.1 C5.A T1.4 U3.5 | length 14.7
  Top w0.508: T1.4 4.11,35.935 6.658,38.483 ; C3.1 6.658,38.483 ; C5.A 7.314,45.382 U3.5 6.456,43.626 6.117,43.287 6.117,39.023 6.658,38.483
N$14: D2.A R19.1 | length 9.9
  Top w0.254: D2.A 17.196,47.366 17.92,46.642 v1(17.92,46.315) ; v1(20.235,42.301) 20.879,41.656 21.615,41.656 22.229,41.042 R19.1
  Bottom w0.254: v1(17.92,46.315) 17.92,44.615 v1(20.235,42.301)
N$15: D1.A R18.1 | length 9.2
  Top w0.254: D1.A 19.33,46.829 v1(19.33,45.883) ; v1(21.26,42.723) 23.309,40.674 R18.1
  Bottom w0.254: v1(19.33,45.883) 19.33,44.653 v1(21.26,42.723)
N$16: IC1.23 R19.2 | length 10.9
  Top w0.178: R19.2 22.903,38.467 IC1.23
N$17: IC1.22 R18.2 | length 10.7
  Top w0.178: R18.2 23.41,39.052 23.41,28.505 IC1.22
N$19: J1.1 L5.1 U11.5 | length 37.3
  Top w0.254: L5.1 17.801,42.931 19.2,44.331 21.31,44.331 22.367,45.388 25.227,45.388 26.215,44.4 31.47,44.4 31.76,44.11 31.76,43.626 J1.1 31.801,42.985 31.801,42.764 32.947,41.628 33.671,41.628 33.887,41.413 33.919,41.413 33.919,38.934 32.451,37.364 30.79,37.364 29.875,36.551 28.372,36.551 27.483,37.44 27.483,39.599 28.108,40.224 28.735,40.224 29.411,39.548 30.196,39.548 30.689,39.055 U11.5
N$20: 
N$21: 
N$22: 
N$23: C3.2 U3.4 | length 1.6
  Top w0.178: U3.4@7.299,41.711 U3.4
  Top w0.406: U3.4 7.503,41.726 C3.2
N$24: 
N$25: 
N$26: 
N$27: 
N$28: IC1.100 IC2.20 | length 12.1
  Top w0.178: IC1.100 37.812,28.956 44.374,28.956 45.538,27.843 IC2.20
N$29: 
N$30: IC1.1 IC2.19 | length 13.8
  Top w0.178: IC1.1 34.717,29.287 44.552,29.287 46.038,27.826 IC2.19
N$31: J1.2 R21.2 U11.4 | length 12
  Top w0.254: R21.2 28.361,39.425 28.869,39.425 U11.4 29.719,38.023 29.942,37.778 32.21,37.778 33.503,39.104 33.503,40.328 32.021,41.811 31.38,41.811 31.14,42.05 31.14,42.974 J1.2
N$32: IC1.2 IC2.18 | length 15.6
  Top w0.178: IC1.2@33.401,28.499 IC1.2 33.403,29.212 33.782,29.642 44.755,29.617 46.538,27.834 IC2.18
N$33: IC1.3 IC2.17 | length 16.9
  Top w0.178: IC1.3@32.893,28.507 IC1.3 32.903,29.245 33.604,29.972 44.933,29.972 47.038,27.867 IC2.17
N$34: J1.3 R20.2 U11.6 | length 14.6
  Top w0.254: R20.2 26.968,36.71 26.492,37.186 26.492,39.777 27.61,40.894 28.016,40.894 28.341,41.22 ; J1.3 30.335,42.819 30.335,42.199 30.171,42.036 29.551,42.036 28.735,41.22 28.341,41.22 ; U11.6@31.603,38.621 U11.6 31.56,39.03 30.404,40.181 29.383,40.183 28.341,41.22
N$35: R6.2 U2.P$2 | length 1.3
  Top w0.406: R6.2 6.451,6.679 U2.P$2
N$36: C6.1 R6.1 | length 1.1
  Top w0.406: R6.1 5.272,6.864 C6.1
N$37: IC1.4 IC2.16 | length 38
  Top w0.178: IC1.4 32.403,29.254 33.503,30.353 44.501,30.353 45.009,30.353 45.034,30.353 47.473,27.915 47.473,7.787 IC2.16
N$38: IC1.5 IC2.15 | length 42
  Top w0.178: IC1.5 31.852,29.185 33.401,30.734 45.161,30.734 47.803,28.067 47.803,6.808 47.32,6.325 46.812,6.325 46.533,6.604 46.533,7.347 IC2.15
N$39: IC1.6 IC2.14 | length 44.5
  Top w0.178: IC1.6 31.403,29.27 33.223,31.09 45.288,31.09 48.158,28.194 48.133,6.604 47.473,5.969 46.609,5.969 46.038,6.541 IC2.14
N$40: IC1.7 IC2.13 | length 47
  Top w0.178: IC1.7 30.886,28.514 30.886,29.287 33.071,31.471 45.39,31.471 48.514,28.347 48.514,6.503 47.6,5.588 46.482,5.588 45.512,6.558 IC2.13
N$41: IC1.61 IC2.3 | length 20.9
  Top w0.152: 31.168,8.738 34.801,8.738 35.188,9.126 36.978,9.126 37.111,8.992 37.111,8.019 37.35,7.781 37.35,6.42 38.11,5.66 39.079,5.66 39.474,6.056
  Top w0.178: 26.903,10.766 IC1.61 ; 30.201,9.698 31.168,8.738 ; 39.474,6.056 39.743,6.325 40.284,6.325 40.538,6.578 IC2.3
  Top w0.2: 26.903,10.766 27.964,9.705 30.194,9.705 ; 30.201,9.698 30.194,9.705 ; 30.201,9.705 30.194,9.705
N$42: IC1.69 IC2.2 | length 13.9
  Top w0.152: 31.674,9.83 34.6,9.83 34.809,10.04 37.356,10.04 38.026,9.37 38.026,8.75 38.368,8.408 39.7,8.408
  Top w0.178: IC1.69 30.903,10.601 31.674,9.83 ; 39.7,8.408 40.03,8.078 40.03,7.359 IC2.2
N$43: IC1.70 IC2.31 | length 25.6
  Top w0.178: v1(29.566,19.482) 29.566,24.715 v1(29.642,24.791) ; IC1.70@31.394,13.106 IC1.70 ; v1(38.141,28.245) 38.382,28.004 39.726,28.042 40.038,27.73 IC2.31
  Top w0.254: v1(31.092,14.605) 31.394,14.303 IC1.70@31.394,13.106
  Bottom w0.178: v1(29.642,24.791) 29.642,25.451 32.497,28.306 v1(38.141,28.245)
  Bottom w0.254: v1(29.566,19.482) 29.566,16.132 v1(31.092,14.605)
N$44: L4.1 U4.3 | length 14.1
  Top w0.508: L4.1 52.636,6.173 U4.3
N$45: IC1.64 IC2.1 | length 17.4
  Top w0.152: 31.344,9.119 34.751,9.119 35.062,9.43 37.104,9.43 37.416,9.118 37.416,8.146 37.655,7.907 37.655,7.655 37.655,7.63 37.655,6.547 38.126,6.076 38.824,6.076 39.134,6.386
  Top w0.178: IC1.64 28.403,12.06 31.344,9.119 ; 39.134,6.386 39.199,6.451 39.538,6.79 IC2.1 IC2.1@39.538,7.178
  Top w0.2: 39.145,6.397 39.199,6.451
N$46: IC1.65 IC2.12 | length 23.4
  Top w0.152: IC1.65 28.903,14.425 30.429,15.952 33.249,15.952 35.636,13.564 41.732,13.564 45.009,10.287 45.009,7.38 IC2.12
N$47: IC1.66 IC2.4 | length 18.4
  Top w0.152: 31.521,9.475 34.675,9.475 34.936,9.735 37.23,9.735 37.721,9.244 37.721,8.272 37.96,8.033 37.96,7.829 v1(38.593,7.196)
  Top w0.178: IC1.66 29.403,11.593 31.521,9.475 ; v1@38.405,7.468 38.593,7.28 v1(38.593,7.196) ; v1(40.538,5.538) 41.038,6.037 IC2.4
  Bottom w0.178: v1(38.593,7.196) 38.626,7.196 40.284,5.538 v1(40.538,5.538)
N$48: IC1.67 IC2.11 | length 21.9
  Top w0.152: IC1.67 29.896,13.105 29.896,14.91 30.607,15.621 33.096,15.621 35.484,13.234 41.529,13.234 44.538,10.225 IC2.11
N$49: IC1.68 IC2.7 | length 20
  Top w0.152: IC1.68 IC1.68 30.388,14.881 30.82,15.314 32.918,15.291 35.281,12.929 41.402,12.929 42.545,11.786 42.545,7.359 IC2.7
N$50: IC1.9 IC2.10 | length 52.1
  Top w0.178: IC1.9 29.953,31.503 30.404,31.852 45.568,31.852 48.895,28.499 48.87,6.376 47.752,5.258 46.279,5.258 45.161,6.401 44.323,6.401 44.038,6.686 IC2.10
N$52: IC1.10 IC2.9 | length 54.8
  Top w0.178: IC1.10 29.439,28.533 29.439,31.573 30.074,32.208 45.847,32.182 49.251,28.829 49.251,6.223 47.955,4.928 46.05,4.928 44.933,6.046 44.196,6.046 43.538,6.704 IC2.9
N$53: C35.1 IC1.50 R23.1 | length 10
  Top w0.254: R23.1 14.703,9.212 C35.1 15.036,9.699 15.941,10.605 16.428,10.605 17.762,11.939 17.762,13.363 19.197,14.798 IC1.50
N$54: C7.1 C19.1 IC2.8 R17.2 | length 5
  Top w0.178: IC2.8 IC2.8@43.053,7.336
  Top w0.254: C19.1@43.053,5.524 IC2.8@43.053,7.336
  Top w0.406: C19.1@43.053,5.524 C19.1 42.855,5.327 C7.1
  Top w0.508: C7.1 44.534,5.327 44.907,4.953 44.907,4.321 R17.2
N$55: C36.1 IC1.47 R24.1 | length 9.1
  Top w0.254: C36.1 13.363,13.649 R24.1 13.973,13.197 14.39,13.615 16.2,13.615 18.883,16.298 IC1.47
N$56: L4.2 R17.1 | length 3.1
  Top w0.508: R17.1 46.618,4.319 L4.2
N$57: C37.1 IC1.52 R25.1 | length 12.2
  Top w0.254: R25.1 C37.1 16.065,7.785 16.441,8.161 17.6,8.161 21.46,12.022 22.118,12.035 22.349,12.266 22.4,12.393 22.403,12.393 IC1.52 ; IC1.52@22.4,13.095 IC1.52 ; IC1.52@22.408,13.092 IC1.52
N$59: C39.1 U1.1 | length 1.1
  Top w0.254: C39.1@6.71,14.345 7.837,14.345 U1.1
N$62: R1.1 R2.2 T1.3 | length 2.3
  Top w0.254: T1.3 6.5,35.521 R2.2 7.59,35.51 R1.1
OPAMP1_OPAMP2_DATA: C34.A IC1.40 | length 10.3
  Top w0.254: C34.A 19.78,12.795 22.36,15.375 22.36,18.865 21.42,19.805 20.196,19.805 IC1.40
PMOD_IO1: IC1.26 SV2.6 | length 27.1
  Top w0.178: v1@13.51,30.219 14.663,30.219 18.085,26.798 IC1.26
  Top w0.254: v1@13.51,30.219 13.515,30.214 v1(13.559,30.214)
  Bottom w0.254: v1(13.559,30.214) 13.559,31.484 10.277,34.765 10.277,40.069 14.56,44.352 SV2.6
PMOD_IO2: IC1.27 SV2.5 | length 27.3
  Top w0.178: v1(12.441,30.219) 12.441,30.056 13.025,29.472 14.341,29.472 17.568,26.298 IC1.27
  Bottom w0.254: SV2.5 12.02,43.73 9.804,41.515 9.804,34.534 11.943,32.396 11.943,30.694 11.966,30.694 v1(12.441,30.219)
PMOD_IO3: IC1.38 SV2.4 | length 32.2
  Top w0.152: v1(10.911,30.194) 12.255,28.85 14.086,28.85 16.755,26.181 16.755,25.23 16.447,24.922 16.447,22.748 18.08,21.114 18.546,21.114 18.863,20.798 IC1.38
  Bottom w0.254: SV2.4 9.314,45.838 9.314,34.349 10.922,32.761 10.912,30.544 v1(10.911,30.194)
PMOD_IO4: IC1.37 SV2.3 | length 34.4
  Top w0.152: v1(9.793,30.196) 9.793,30.244 10.45,30.901 11.169,30.901 11.593,30.476 11.593,30.102 12.541,29.155 14.211,29.155 15.12,28.261 17.06,26.32 17.06,25.104 16.751,24.795 16.751,22.874 18.206,21.419 20.081,21.419 IC1.37
  Bottom w0.254: SV2.3 6.92,45.984 6.92,43.44 8.791,41.57 8.791,34.153 9.793,33.151 v1(9.793,30.196)
REF_CPU_OUT: C40.1 R23.2 R24.2 R25.2 U1.5 U1.6 | length 14.5
  Top w0.203: R25.2@12.92,8.805 R25.2
  Top w0.254: U1.5 10.728,13.389 11.285,12.832 11.285,12.367 13.306,10.346 ; C40.1 11.173,15.27 U1.6 10.929,14.339 13.178,12.091 13.922,12.091 R24.2 R23.2 13.306,10.346 ; R25.2 12.97,10.052 13.306,10.346
SD_CD: JP1.Z3 JP1.Z4 R10.1 | length 13.4
  Top w0.254: R10.1 42.955,32.998 43.089,32.864 47.367,32.864 JP1.Z3 JP1.Z4
SD_CPU_MISO: IC1.13 JP1.7 | length 34.9
  Top w0.152: IC1.13@27.9,28.5 IC1.13
  Top w0.2: IC1.13 28,28.595 28,31.116 29.786,32.902 30.361,32.902 ; 30.361,32.901 36.991,32.89 38.42,32.89 45.237,39.708 47.576,39.708 48.373,38.91 52.38,38.91 53.76,40.291 JP1.7
  Top w0.254: IC1.13 IC1.13@27.973,28.568
SRAM_CPU_D0: IC1.92 IC2.21 | length 12.6
  Top w0.178: IC1.92 43.041,22.747 45.11,24.842 45.11,26.903 IC2.21
SRAM_CPU_D1: IC1.93 IC2.22 | length 12
  Top w0.178: IC1.93 43.059,23.298 44.729,24.969 44.729,25.959 44.552,26.137 44.552,27.038 IC2.22
SRAM_CPU_D2: IC1.94 IC2.23 | length 11.3
  Top w0.178: IC1.94 43.05,23.798 44.247,24.994 44.298,25.68 44.044,25.934 44.044,27.046 IC2.23
SRAM_CPU_D3: IC1.95 IC2.25 | length 9.3
  Top w0.178: IC1.95 41.468,24.298 43.053,25.883 43.053,27.036 IC2.25
SRAM_CPU_D4: IC1.96 IC2.26 | length 8.5
  Top w0.178: IC1.96 41.409,24.798 42.545,25.934 42.545,27.044 IC2.26
SRAM_CPU_D5: IC1.97 IC2.27 | length 7.8
  Top w0.178: IC1.97 41.299,25.298 42.037,26.035 IC2.27
SRAM_CPU_D6: IC1.98 IC2.28 | length 7.1
  Top w0.178: IC1.98 41.197,25.709 41.538,26.146 IC2.28
SRAM_CPU_D7: IC1.99 IC2.29 | length 6.4
  Top w0.178: IC1.99 35.662,26.239 37.821,26.239 37.915,26.107 40.912,26.107 41.072,26.467 41.072,27.017 IC2.29
SWCLK: IC1.76 SV1.3 | length 22.4
  Top w0.178: IC1.76 36.663,14.798 37.084,14.377 43.358,14.377 44.704,13.031 v1(44.704,12.573)
  Bottom w0.178: v1(44.704,12.573) 47.839,9.439 SV1.3
SWDIO: IC1.77 SV1.2 | length 21.3
  Top w0.178: IC1.77 36.824,15.298 37.236,14.885 v1(44.094,14.885)
  Bottom w0.178: v1(44.094,14.885) 47.001,11.979 SV1.2
SWI_CPU_RST: IC1.36 SV1.5 | length 47.6
  Top w0.178: IC1.36 22.602,21.798 v1(23.673,20.727)
  Bottom w0.178: v1(23.673,20.727) 24.811,19.589 24.811,14.331 30.709,8.433 33.274,8.433 35.557,10.717 39.853,10.717 44.699,5.87 44.755,5.87 44.755,5.832 46.228,4.359 SV1.5
  Bottom w0.508: v1(23.673,20.727) v1@23.698,20.701
SWO: IC1.78 SV1.4 | length 27.2
  Top w0.178: IC1.78 36.857,15.798 37.363,15.291 43.383,15.291 43.917,15.825 45.187,15.825 46.203,14.809 v1(46.203,9.449)
  Bottom w0.178: v1(46.203,9.449) 48.753,6.899 SV1.4
USB_ENABLE: C10.2 IC1.54 R9.1 SW1.2 | length 24.2
  Top w0.152: 23.089,8.63 23.089,11.872 ; 25.346,2.698 27.268,4.62 28.81,4.62 30.008,5.819 30.008,6.48 SW1.2@30.008,6.62
  Top w0.178: 23.089,11.872 23.403,12.186 IC1.54
  Top w0.2: 23.089,8.63 23.872,7.847 23.872,3.019 24.193,2.698 25.346,2.698 ; R9.1@29.493,8.667 30.008,8.152 30.008,6.62 SW1.2 SW1.2@30.332,6.934
  Top w0.254: SW1.2@30.008,6.48 30.918,7.39 31.371,7.39 C10.2
VAMP: C1.A U2.P$6 U5.6 | length 19.2
  Top w0.406: U2.P$6 7.974,2.864 C1.A 12.471,2.506 13.666,1.311 19.266,1.311 21.036,3.081 21.036,4.164 U5.6
VBAT: C2.1 R4.2 U3.1 U3.3 U6.PWR@1 | length 37.1
  Top w0.178: v1(24.44,34.781) 24.181,35.04 24.181,37.831 24.447,38.098 24.447,38.718 24.949,39.22 R4.2
  Top w0.254: v1(5.76,32.379) 10.331,32.379 v1(14.884,36.93)
  Top w0.508: v1(2.235,36.729) 2.687,37.181 2.687,39.111 ; C2.1 3.075,43.626 U3.1 ; U3.3@4.714,41.72 U3.3
  Bottom w0.254: v1(2.235,36.729) 2.235,34.801 3.947,33.089 5.049,33.089 v1(5.76,32.379) ; v1(14.884,36.93) 21.66,36.93 23.81,34.781 v1(24.44,34.781)
VBUS: C14.1 IC1.72 IC1.79 L5.2 R1.2 T1.1 | length 58.2
  Top w0.178: IC1.79 37.455,16.298 C14.1
  Top w0.254: T1.1 8.6,33.711 ; R1.2 8.6,34.441 8.6,33.711 ; L5.2 16.225,40.365 9.57,33.711 8.6,33.711 ; v1(32.004,17.272) 32.029,17.298 33.833,17.298 34.833,16.298 IC1.79 ; IC1.72 32.403,14.242 v1(32.664,14.504)
  Top w0.508: L5.2 17.801,31.115 v1(18.726,30.189) ; v1(22.86,25.477) 22.885,24.791 22.86,24.765 22.86,23.521 25.4,20.981 25.4,18.39 26.797,16.993 31.725,16.993 v1@32.029,17.298
  Bottom w0.508: v1(18.726,30.189) 18.726,29.61 v1(22.86,25.477) ; v1(32.004,17.272) 32.004,17.247 32.69,16.561 32.69,14.529 v1(32.664,14.504)
VDD: C12.1 C13.1 C15.1 C38.1 IC1.41 IC1.45 R3.1 R16.1 U1.4 U5.1 | length 106
  Top w0.2: U5.1 25.715,6.307 R3.1
  Top w0.254: U1.4 10.242,11.777 C38.1 ; C13.1 17.022,16.811 17.022,16.86 17.22,17.026 18.001,17.026 18.215,17.272 20.178,17.272 IC1.45 ; C15.1 17.336,19.298 IC1.41 ; U5.1 25.029,4.095 v1(25.047,4.077)
  Top w0.5: v1(14.95,24.564) 14.95,24.363 15.801,23.512 15.801,20.614 16.689,19.726 16.908,19.726 C15.1
  Top w0.508: R16.1 6.308,27.061 v1(6.274,27.026) 6.02,26.772 6.02,22.251 7.623,20.648 ; U1.4 9.499,12.439 9.037,12.901 9.037,16.734 10.262,17.958 10.312,17.958 ; C12.1 C12.1@15.414,16.583 ; C13.1 C12.1@15.414,16.583 ; C15.1@17.183,19.406 C15.1 ; v1(22.073,3.683) 22.073,1.829 20.902,0.658 1.55,0.658 0.682,1.527 0.682,13.708 7.623,20.648 ; 7.623,20.648 10.312,17.958 ; 10.312,17.958 11.637,16.634 11.637,16.583 C12.1@15.414,16.583
  Bottom w0.5: 14.09,28.39 14.95,27.53 v1(14.95,24.564)
  Bottom w0.508: v1(6.274,27.026) 8.669,27.026 10.033,28.39 14.09,28.39 ; v1(22.073,3.683) 22.466,4.077 v1(25.047,4.077)
VMIC_EN_N: IC1.60 R3.2 U5.2 | length 7.1
  Top w0.178: IC1.60 IC1.60@26.467,13.034
  Top w0.2: U5.2 25.365,6.957 25.447,7.038 25.447,7.045 25.595,7.193 25.602,7.193 R3.2 26.049,7.845 26.466,8.262 26.466,11.411 26.4,11.477 26.4,13.095 IC1.60
VREF_EN: IC1.30 U1.3 | length 22.1
  Top w0.178: v1(6.623,12.421) 7.824,12.421 U1.3 ; v1(17.501,23.089) 17.069,23.521 17.069,24.664 17.323,24.918 19.279,24.918 19.406,24.791 20.196,24.791 IC1.30 IC1.30@20.221,24.816
  Bottom w0.178: v1(6.623,12.421) 6.623,13.242 16.469,23.089 v1(17.501,23.089)
VREGO: C16.1 IC1.73 T1.5 | length 88
  Top w0.254: C16.1 31.977,11.81 32.903,11.669 IC1.73
  Top w0.406: 32.739,11.61 33.706,10.719
  Top w0.508: v1(1.355,24.037) 0.781,24.611 0.781,27.201 0.87,27.29 0.87,33.66 1.87,34.66 T1.5 ; C16.1@31.977,11.81 32.739,11.61 ; 33.706,10.719 36.017,10.77 37.414,10.77 v1(39.014,9.17)
  Bottom w0.508: v1(1.355,24.037) 1.341,24.043 1.351,2.63 1.351,2.4 ccw(c2.395,2.4) 2.395,1.356 3.84,1.356 21.512,1.326 22.425,1.326 ccw(c22.425,2.1) 23.2,2.1 23.2,2.4 cw(c24,2.4) 24,3.2 25.4,3.2 ccw(c25.5,3.6) 25.9,3.501 cw(c26.45,3.601) 26.35,4.15 33.995,4.15 v1(39.014,9.17)
pads on no net: IC1.11 IC1.19 IC1.20 IC1.28 IC1.29 IC1.33 IC1.34 IC1.35 IC1.39 IC1.46 IC1.56 IC1.62 IC1.63 IC1.71 IC1.80 IC1.81 IC1.84 IC1.85 J1.4 J1.P$1 J1.P$2 J1.P$3 J1.P$4 J1.P$5 J1.P$6 J1.P$7 JP1.1 JP1.8 SW1.4 U5.3 U5.4 U5.5 U11.1 U11.3 Y1.NC1 Y1.NC2

## Polygon pours and split planes (outlines as drawn)
AGND on Bottom "Polygon_2_Net_AGND" (solid, remove dead copper, pour order 1): 2.114,21.941 18.114,21.954 22.768,17.354 22.817,5.131 22.801,1.56 2.032,1.583 1.758,1.627 1.717,21.799
GND on Bottom "Polygon_1_Net_GND" (solid, remove dead copper, pour order 4): 1.109,48.437 25.623,48.437 26.163,47.897 34.877,47.897 34.907,47.927 35.077,47.927 35.627,48.477 42.063,48.477 43.093,47.447 56.759,47.447 56.996,47.415 57.976,47.136 58.046,0.05 22.851,0.128 23.096,1.143 22.954,17.503 18.145,22.202 17.828,22.142 0.075,22.129 0.279,47.714
AGND on Top "Polygon_1_Net_AGND" (solid, remove dead copper, pour order 2): 0.019,0.02 0.199,22.105 18.544,22.073 22.789,17.828 22.789,17.657 22.783,17.651 22.654,8.297 22.651,5.809 22.547,0.18 19.911,0.036
VBAT on Top "Polygon_1_Net_VBAT" (solid, remove dead copper, pour order 0): 6.359,48.328 1.508,48.418 cw(c1.535,47.068) 0.573,48.016 cw(c0.829,47.44) 0.241,47.666 0.261,37.309 ccw(c0.502,37.309) 0.362,37.112 4.584,37.112 ccw(c4.584,37.379) 4.772,37.19 6.305,38.723 6.332,44.762 cw(c6.415,44.814) 6.348,44.886 6.288,44.974
+3V3 on Top "Polygon_1_Net_+3V3" (solid, remove dead copper, pour order 3): 6.921,48.298 25.638,48.298 26.047,47.889 35.093,47.889 35.133,47.929 35.243,47.929 35.683,48.369 41.987,48.369 42.907,47.449 56.713,47.449 56.762,47.497 57.729,47.291 57.952,47.069 58.052,0.37 57.771,0.089 23.484,0.089 23.229,0.344 23.076,18.859 19.217,22.518 0.329,22.772 0.089,23.192 0.089,36.039 0.275,36.411 4.84,36.411 7.099,38.671 7.099,47.919 6.921,48.097

## Keep-outs
Keep-Out Layer:
  the board outline again, w0.2

## Other copper
Bottom:
  region: 52.932,13.877 52.932,15.165 58.235,15.165 58.235,13.877
  region: 52.944,8.808 52.944,10.096 58.247,10.096 58.247,8.808

## Silkscreen, mask and mechanical layers (free items; w line width, h text height)
Bottom Paste:
  region: 52.932,13.87 52.932,15.157 58.235,15.157 58.235,13.87
  region: 52.944,8.828 52.944,10.116 58.247,10.116 58.247,8.828
Bottom Solder:
  region: 52.828,8.717 52.828,10.197 58.248,10.197 58.248,8.717
  region: 52.806,13.779 52.806,15.259 58.226,15.259 58.226,13.779
Dimension:
  the board outline again, w0.2
bPlace:
  drawing of 7493 lines, arcs and shapes, not listed
  text "tx" at 7.48,43.28 h1.57
  text "rx" at 10.1,43.28 h1.57
  text "1.1.0" at 15.646,11.135 h1.97
  text "PROG" at 48.188,10.481 h0.86 r270
  text "USB/OFF" at 31.43,2.072 h0.86 r270
  text "CUSTOM" at 34.185,2.049 h0.86 r270
  text "DEFAULT" at 28.473,2.037 h0.86 r270

## Text inside footprints (layer, text, board x,y; h text height)
J1: Reference "CONNECTOR FRONT INTERFACE" at 33.806,47.84 h0.46 r180; Reference "PCB EDGE" at 31.456,47.14 h0.46 r180
JP1: tDocu "8" at 54.78,39.631 h1.97; tDocu "6" at 53.51,43.441 h1.97; tDocu "4" at 50.97,43.441 h1.97; tDocu "2" at 48.43,43.441 h1.97
Y2: tPlace "48MHz" at 14.613,22.489 h1.97 r180